# Altium PCB Transmitter_PCB.PcbDoc (part 1 of 3)
Units mil, origin at the board's own origin, x right, y up, seen from the top; angles counter-clockwise.
Board outline 1968.5 x 1968.5 mil, 2 copper layers (Top Layer, Bottom Layer), stack 57 mil thick; 93 components, 58 nets, 274 pads, 96 vias.
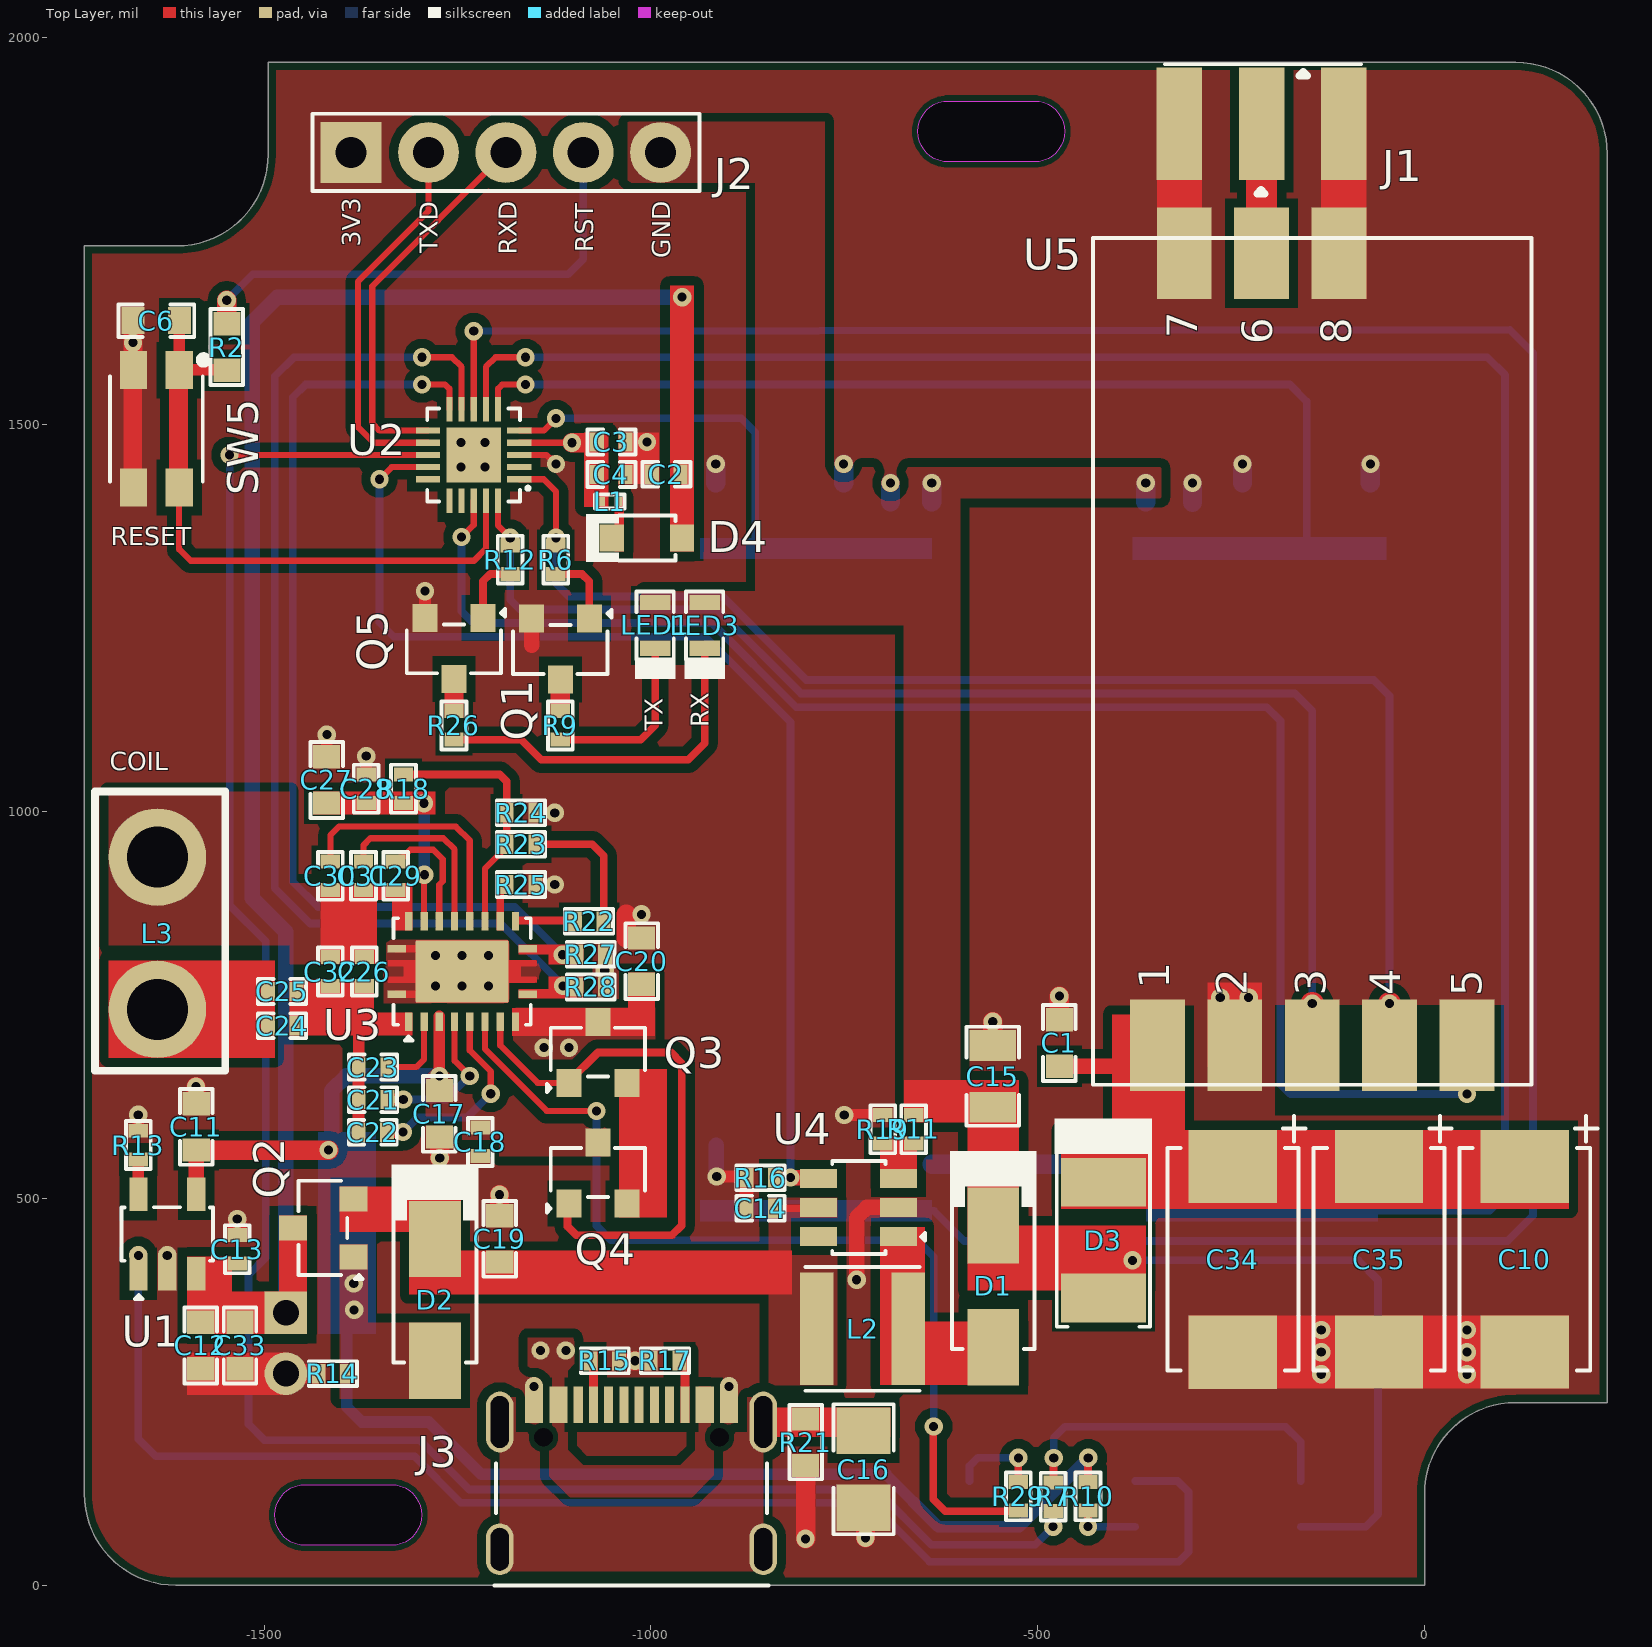
[diagram p0: Top Layer view]
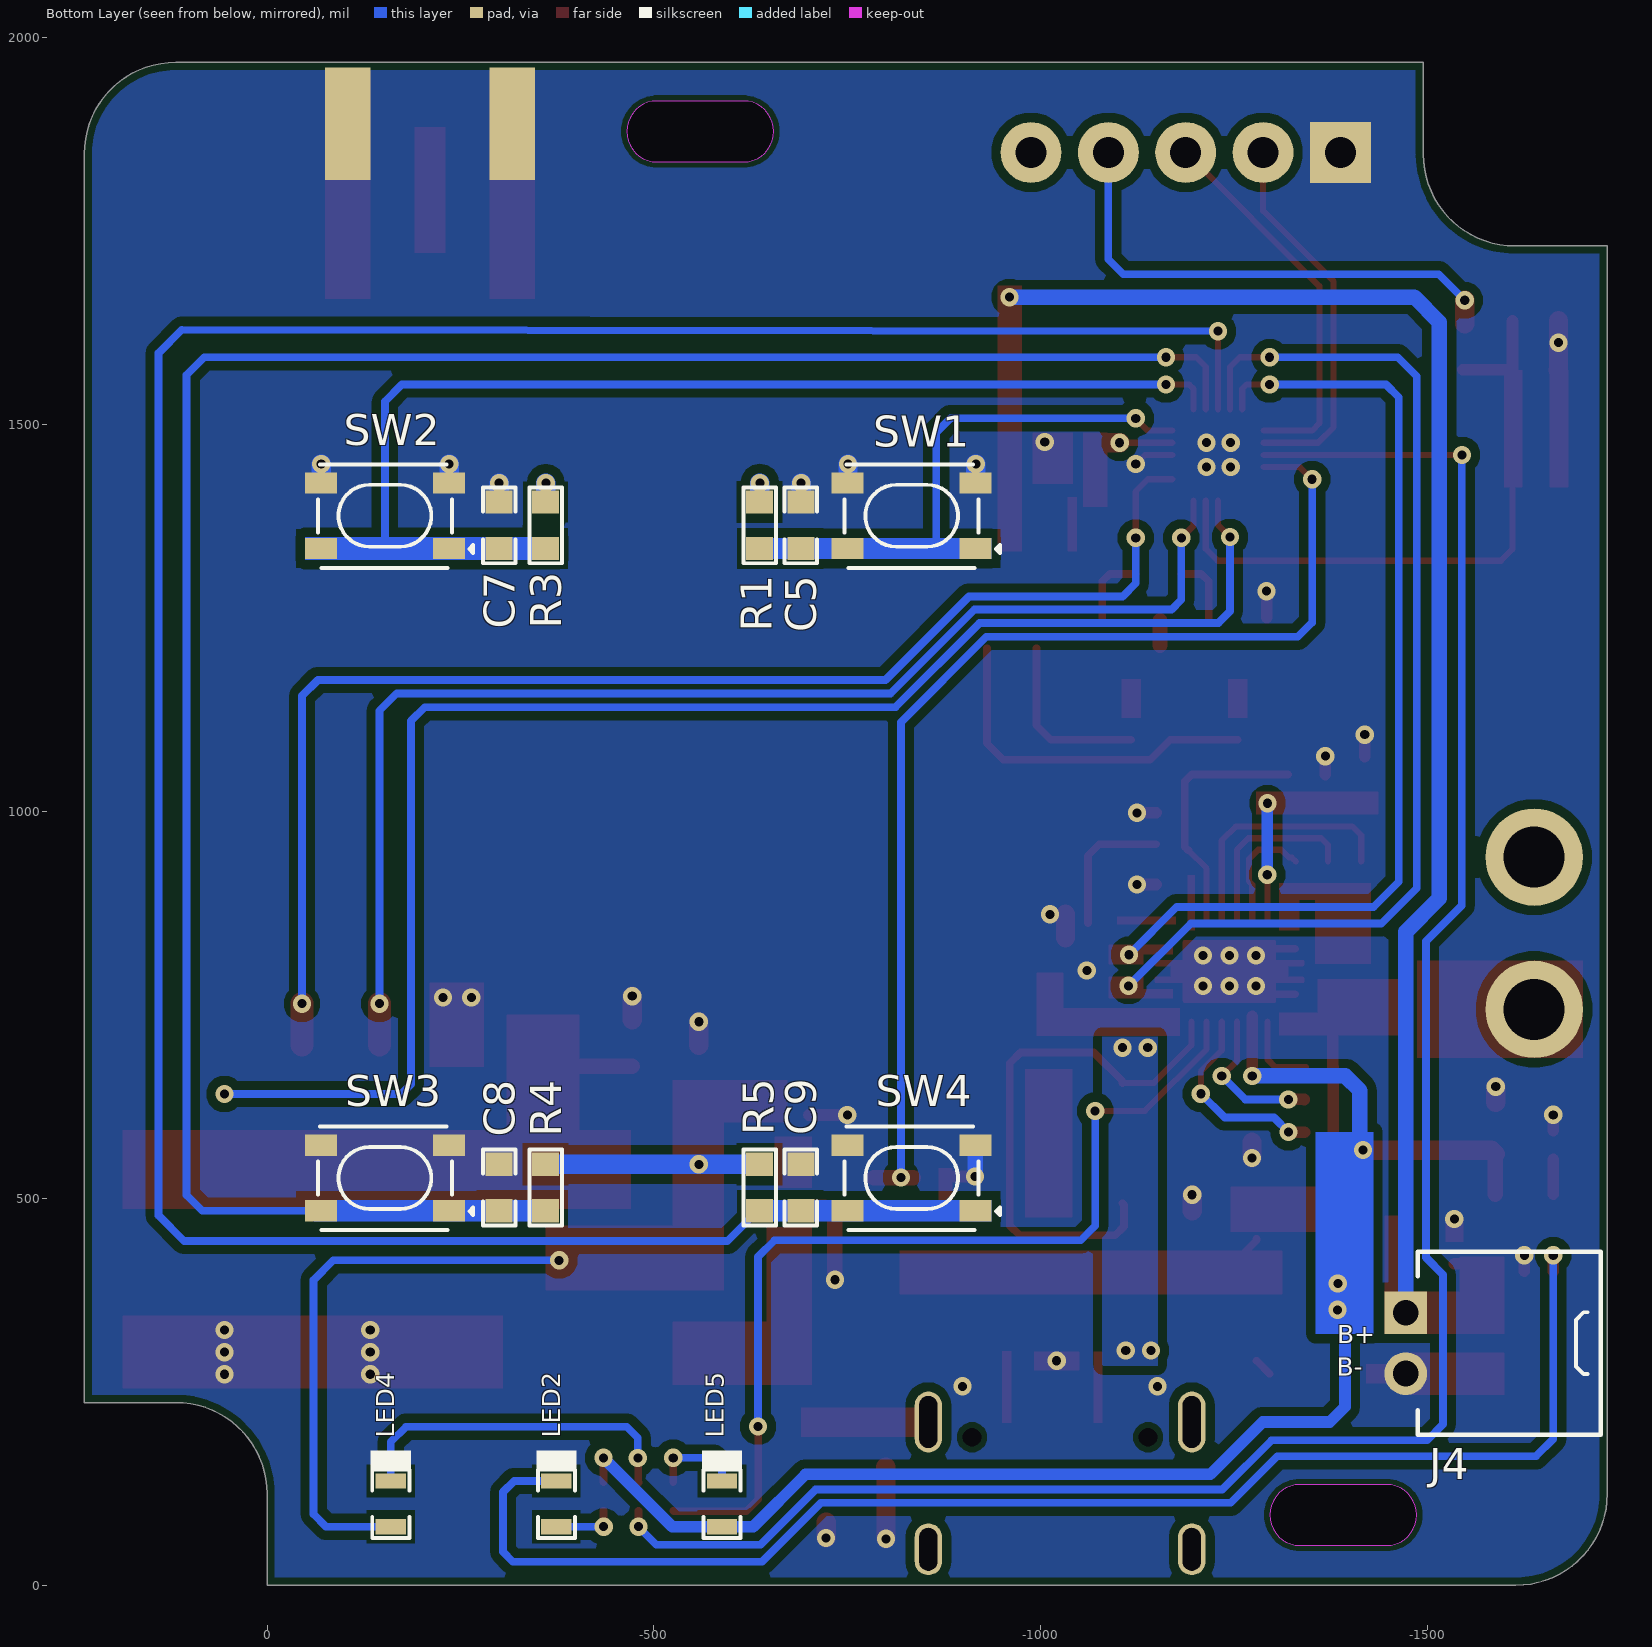
[diagram p1: Bottom Layer view, seen from below]
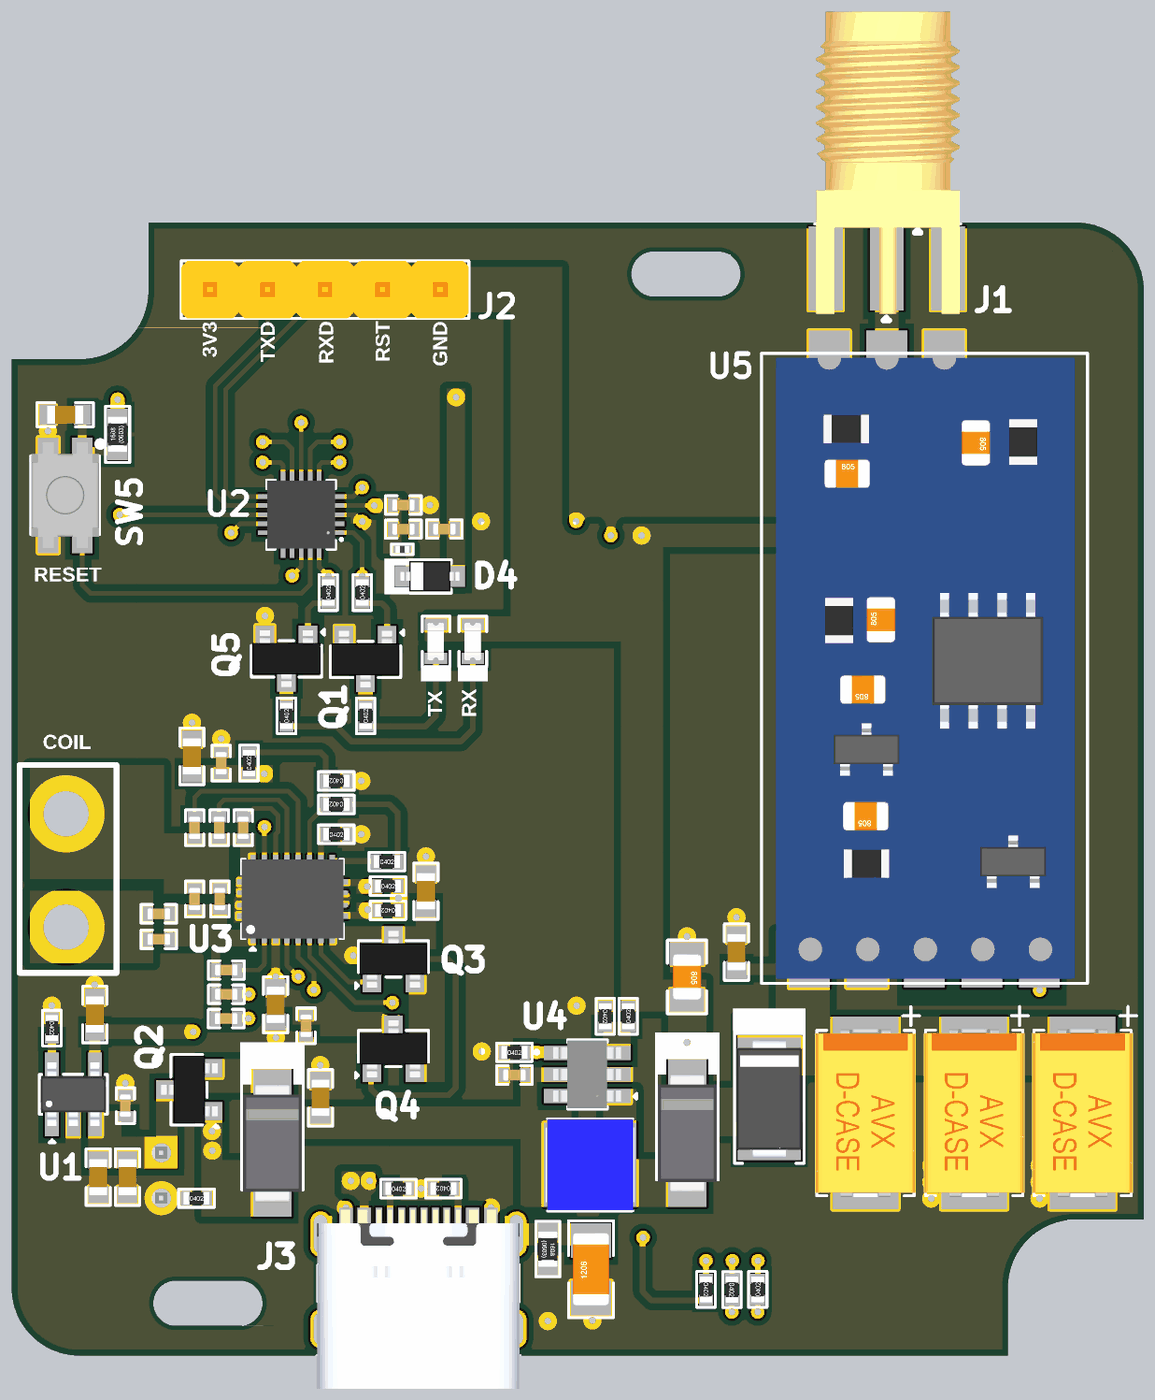
[diagram p3: 3D render of the assembled board from above, using the file's embedded part models]
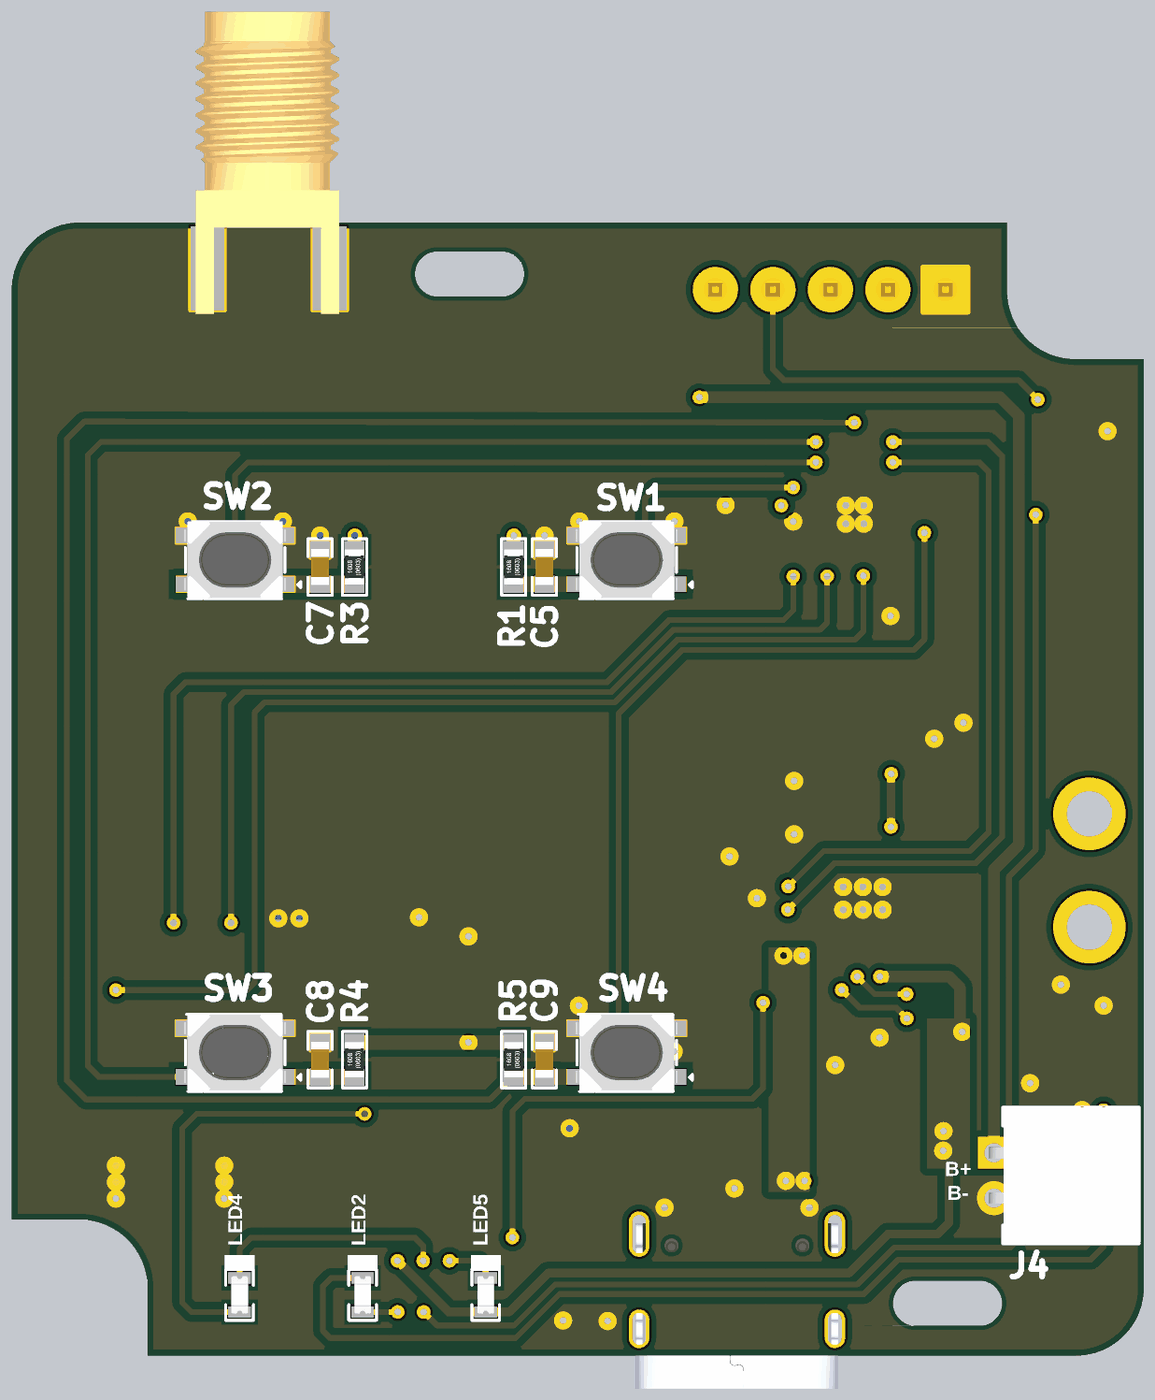
[diagram p4: 3D render of the assembled board from below, using the file's embedded part models]

## Layer stack, top to bottom
Top Solder: solder mask 3, Solder Resist, Dk 3.5
Top Layer: signal copper 10
Dielectric 1: dielectric 37, FR-4, Dk 4.8
Bottom Layer: signal copper 10
Bottom Solder: solder mask 3, Solder Resist, Dk 3.5

## Board outline
-1732.28,118.11 -1732.28,1731.28 -1614.5,1731.28 -1612.68,1731.28 ccw(c-1612.68,1849.39) -1494.57,1849.39 -1494.57,1968.5 118.11,1968.5 cw(c118.11,1850.39) 236.22,1850.39 236.22,236.22 119.94,236.22 118.11,236.22 ccw(c118.11,118.11) 0,118.11 0,0 -1614.17,0 cw(c-1614.17,118.11)
cut-out: -615.59,1839.77 cw(c-615.59,1879.14) -654.96,1879.14 cw(c-615.59,1879.14) -615.59,1918.51 -504.33,1918.51 cw(c-504.33,1879.14) -464.96,1879.14 cw(c-504.33,1879.14) -504.33,1839.77
cut-out: -1446.69,51.5 cw(c-1446.69,90.87) -1486.06,90.87 cw(c-1446.69,90.87) -1446.69,130.24 -1335.43,130.24 cw(c-1335.43,90.87) -1296.06,90.87 cw(c-1335.43,90.87) -1335.43,51.5

## Design rules (kind name [scope] priority, off if disabled: settings)
BoardOutlineClearance [All] p1: gap=0 ignorepadtopadclearanceinfootprint=FALSE except(10: Poly-OutlineEdge)
Clearance [All] p1: gap=7 ignorepadtopadclearanceinfootprint=FALSE except(5: SMDPad-Hole; 12: Arc-Poly Track-Poly SMDPad-Poly THPad-Poly Via-Poly Fill-Poly Poly-Poly)
ComponentClearance [All] p1: gap=0 collisioncheckmode=3 verticalgap=0 showdistances=FALSE
HoleSize [All] p1: absolutevalues=TRUE maxlimit=1000 minlimit=1 maxpercent=80.000 minpercent=20.000
HoleToHoleClearance [All] p1: gap=0 allowstackedmicrovias=TRUE
MinimumSolderMaskSliver [All] p1: minsoldermaskwidth=0
PolygonConnect [All] p1: connectstyle=Direct reliefconductorwidth=10 reliefentries=4 polygonreliefangle="90 Angle" airgapwidth=10
RoutingVias [All] p1: holewidth=11.81 width=23.62 viastyle="Through Hole" minholewidth=11.81 minwidth=19.68 maxholewidth=11.81 maxwidth=23.62
SilkToSilkClearance [All] p1: silktosilkclearance=0
SilkToSolderMaskClearance [IsPad] p1: minsilkscreentomaskgap=0 clearancetoexposedcopper=TRUE
SolderMaskExpansion [All] p1: expansion=4 istentingtop=FALSE
SupplyNets "Schematic Supply Nets_9" [InNet('EN1')] p1: voltage=0.000
SupplyNets "Schematic Supply Nets_8" [InNet('EN2')] p2: voltage=0.000
SupplyNets "Schematic Supply Nets_7" [InNet('GND')] p3: voltage=0.000
SupplyNets "Schematic Supply Nets_6" [InNet('VUSB')] p4: voltage=0.000
SupplyNets "Schematic Supply Nets_5" [InNet('VCC')] p5: voltage=0.000
SupplyNets "Schematic Supply Nets_4" [InNet('EN')] p6: voltage=0.000
SupplyNets "Schematic Supply Nets_3" [InNet('+5V')] p7: voltage=0.000
SupplyNets "Schematic Supply Nets_2" [InNet('VBAT')] p8: voltage=0.000
SupplyNets "Schematic Supply Nets_1" [InNet('POWER')] p9: voltage=0.000
SupplyNets "Schematic Supply Nets" [InNet('VCC#')] p10: voltage=0.000
Width [All] p1: maxlimit=50 minlimit=6 preferedwidth=10 minimp=50.000000 maximp=50.000000 favimp=50.000000
24 further rules are at their usual default settings.

## Classes and differential pairs
component class U_Power_Sheet: C11 C12 C13 C14 C15 C16 C17 C18 C19 C20 C21 C22 C23 C24 C25 C26 C27 C28 C29 C30 C31 C32 D1 D2 J3 L2 L3 LED2 Q2 Q3 Q4 R10 R11 R13 R14 R15 R16 R17 R18 R19 R21 R22 R23 R24 R25 R27 R28 U1 U3 U4
component class U_Transmitter_Section: C1 C2 C3 C4 C5 C6 C7 C8 C9 C10 C33 C34 C35 D3 D4 J1 J2 J4 L1 LED1 LED3 LED4 LED5 Q1 Q5 R1 R2 R3 R4 R5 R6 R7 R9 R12 R26 R29 SW1 SW2 SW3 SW4 SW5 U2 U5

## Components (designator, comment, footprint, x,y, rotation, side; value= is the part's Value field where it differs from the comment)
C1 "0.1uF" Cap0603 -472,701 r90 top
C2 "0.47uF" Cap-0402 -980,1436 r180 top
C3 "0.1uF" Cap-0402 -1051.08,1477.81 r180 top value=100nF
C4 "1uF" Cap-0402 -1051.08,1435.81 r180 top
C5 "0.1uF" Cap0603 -690,1370.1 r90 bottom
C6 "DNP" Cap0603 -1639.24,1634.63 r180 top
C7 "0.1uF" Cap0603 -300,1370.1 r90 bottom
C8 "0.1uF" Cap0603 -300,514.1 r90 bottom
C9 "0.1uF" Cap0603 -690,514.1 r90 bottom
C10 "330uF" CASE-D 129.64,421.46 r270 top
C11 "10uF" Cap-0603 -1587.6,592.5 r270 top
C12 "10uF" Cap-0603 -1581.79,310 r90 top
C13 "1nF" Cap-0402 -1534.58,434.32 r270 top
C14 "1nF" Cap-0402 -858.14,487.42 r0 top
C15 "22uF" Cap-0805 -558.08,657.9 r270 top
C16 "4.7nF" Cap-1206 -725,150 r90 top
C17 "10uF" Cap-0603 -1273.42,609.37 r90 top
C18 "100nF" Cap-0402 -1220.46,573.1 r90 top
C19 "10uF" Cap-0603 -1195.28,447.74 r270 top
C20 "10uF" Cap-0603 -1011.97,806.73 r90 top
C21 "0.47uF" Cap-0402 -1359.09,627.8 r0 top value=470nF
C22 "22nF" Cap-0402 -1359.38,585.6 r0 top
C23 "10nF" Cap-0402 -1359.09,669.84 r0 top
C24 "68nF" Cap-0402 -1476.57,723.22 r0 top
C25 "68nF" Cap-0402 -1476.56,767.54 r0 top
C26 "1nF" Cap-0402 -1370.29,793.33 r270 top
C27 "10uF" Cap-0603 -1418.99,1040.96 r270 top
C28 "100nF" Cap-0402 -1367.99,1029.5 r270 top
C29 "10nF" Cap-0402 -1329.68,917.04 r90 top
C30 "22nF" Cap-0402 -1414.27,917.04 r90 top
C31 "0.47uF" Cap-0402 -1371.42,917.04 r90 top value=470nF
C32 "1nF" Cap-0402 -1414.27,793.33 r270 top
C33 "0.47uF" Cap-0603 -1531,310 r90 top
C34 "330uF" CASE-D -247.72,421.34 r270 top
C35 "330uF" CASE-D -58.76,421.46 r270 top
D1 "SS32 /SMA(DO-214AC)" SMA -557.4,386.43 r270 top
D2 "SS16" SMA -1279,369 r270 top
D3 "1N4007- SMD" SMA(DO-214AC) -415,446 r270 top
D4 "CUS10S30,H3F" SOD-323 -1005.1,1353.68 r0 top
J1 "SMA Jack" CON-SMA-EDGE_S -316.85,1889 r270 top
J2 "DNP" HDR1X5 -1187.37,1852 r0 top
J3 "TYPE-C-31-M-12" TYPE-C-31-M-12_ -1025,140 r0 top
J4 "PH-2AW" PH-2AW -1471.79,312.88 r270 bottom
L1 "MMZ0603S601CT000" "IND 0201" -1053.08,1400.81 r180 top
L2 "4.7uH" SPH4012H4R7MT -726.4,331.43 r0 top
L3 "13.3uH" "Th Hole Test Point (3.7mm Drill 6mm pad)" -1637.79,941.22 r270 top
LED1 "Yellow" LED-0603 -994.44,1240.69 r270 top
LED2 "RED" LED-0603 -374,105.31 r90 bottom
LED3 "Yellow" LED-0603 -930.44,1240.69 r270 top
LED4 "RED" LED-0603 -160,105.31 r90 bottom
LED5 "Emerald" LED-0603 -588,105.31 r90 bottom
Q1 "L8050QLT1G" SOT-23 -1117,1210 r180 top
Q2 "WPM2015-3/TR" Sot-23 -1423.42,461.82 r90 top
Q3 "WPM2015-3/TR" Sot-23 -1068.37,688.7 r0 top
Q4 "WPM2015-3/TR" Sot-23 -1068.37,533 r0 top
Q5 "L8050QLT1G" SOT-23 -1254.49,1210.88 r180 top
R1 "4.7K" RES-0603 -636.64,1370.1 r270 bottom
R2 "4.7K" RES-0603 -1548.13,1600.49 r270 top
R3 "4.7K" RES-0603 -360,1370.1 r270 bottom
R4 "4.7K" RES-0603 -360,514.1 r270 bottom
R5 "4.7K" RES-0603 -636.64,514.1 r270 bottom
R6 "1K" Res-0402 -1122.74,1325.65 r90 top
R7 "120R" Res-0402 -480,114.5 r270 top
R9 "120R" Res-0402 -1117,1111.5 r90 top
R10 "680R" Res-0402 -435,115 r90 top
R11 "11K" Res-0402 -660.35,589.4 r90 top value=11kR
R12 "1K" Res-0402 -1181.9,1325.65 r90 top
R13 "2.7K" Res-0402 -1662.4,569 r270 top value=2.7kR
R14 "100K" Res-0402 -1411,273.51 r0 top
R15 "5.1K" Res-0402 -1059.53,289.99 r0 top
R16 "10K" Res-0402 -858.14,526.83 r0 top
R17 "5.1K" Res-0402 -981.69,290 r180 top
R18 "20K" Res-0402 -1319.68,1029.5 r90 top
R19 "1.5K" Res-0402 -700.11,589.4 r270 top
R21 "1M" Res-0603 -800,185 r90 top
R22 "470R" Res-0402 -1079.79,858.29 r0 top
R23 "80.6R" Res-0402 -1167.79,957.66 r180 top
R24 "200R" Res-0402 -1167.79,998.37 r180 top
R25 "10K" Res-0402 -1167.79,905.73 r0 top
R26 "120R" Res-0402 -1254.49,1111.5 r90 top
R27 "100K" Res-0402 -1077.79,815.62 r0 top
R28 "100K" Res-0402 -1077.79,773.37 r180 top
R29 "120R" Res-0402 -525,115 r270 top
SW1 "TSA016A2518A" TSA016A2518A -833.16,1382.42 r0 bottom
SW2 "TSA016A2518A" TSA016A2518A -152.29,1382.42 r0 bottom
SW3 "TSA016A2518A" TSA016A2518A -152.29,526.42 r0 bottom
SW4 "TSA016A2518A" TSA016A2518A -833.17,526.42 r0 bottom
SW5 "TS-1185EC-C-D-B" TS-1185EC-C-D-B -1639.24,1494.79 r270 top
U1 "TP4054" SOT-23-5 -1625,454 r90 top
U2 "ATTINY1616-MNR" 20-QFN -1228.95,1461.04 r180 top
U3 "BQ51013BRHLR" "20-VQFN (3.5x4.5)" -1243.89,793.33 r90 top
U4 "MT3608" SOT-23-6 -731.6,488.42 r180 top
U5 "HC-12 SMD" "HC-12 Module SMD" -108.73,1205 r90 top

## Footprints (in the part's own frame and the unit in brackets; to place one, negate y for a bottom-side part, rotate by r counter-clockwise, add the part's x,y. Pads: shape width x height; smd on the part's side, far side on the other; paste and mask are expansions set on the pad)
20-QFN [mm] "IC MCU 8BIT 16KB FLASH 20VQFN"
  rect 0.8x0.2 smd: 1(-1.5,0.8) 2(-1.5,0.4) 3(-1.5,0) 4(-1.5,-0.4) 5(-1.5,-0.8) 11(1.5,-0.8) 12(1.5,-0.4) 13(1.5,0) 14(1.5,0.4) 15(1.5,0.8)
  rect 0.2x0.8 smd: 6(-0.8,-1.5) 7(-0.4,-1.5) 8(0,-1.5) 9(0.4,-1.5) 10(0.8,-1.5) 16(0.8,1.5) 17(0.4,1.5) 18(0,1.5) 19(-0.4,1.5) 20(-0.8,1.5)
  rect 1.8x1.8 smd: 21(0,0)
  silkscreen extent -1.83,-1.52 1.52,1.52, body extent -1.5,-1.5 1.5,1.5, height 0.59
"20-VQFN (3.5x4.5)" [mm]
  rect 0.24x0.6 smd: 1(-0.75,2.15) 10(-0.75,-2.15) 11(0.75,-2.15) 20(0.75,2.15)
  rect 0.6x0.24 smd: 2(-1.65,1.75) 3(-1.65,1.25) 4(-1.65,0.75) 5(-1.65,0.25) 6(-1.65,-0.25) 7(-1.65,-0.75) 8(-1.65,-1.25) 9(-1.65,-1.75) 12(1.65,-1.75) 13(1.65,-1.25) 14(1.65,-0.75) 15(1.65,-0.25) 16(1.65,0.25) 17(1.65,0.75) 18(1.65,1.25) 19(1.65,1.75)
  rrect5% 2.05x3.05 smd paste-3: 21(0,0)
  Top Layer region: 381 vertices and 0 holes, not listed, extent -1.025,-2.45 1.025,2.45
  silkscreen extent -2.26,-2.25 1.75,2.25, body extent -1.75,-2.25 1.75,2.25, height 1
Cap0603 [mil]
  rect 30x35 smd mask+2.36: 1(-30,0) 2(30,0)
  silkscreen extent -49,-21 49,21, body extent -32,-16 31,16, height 34
Cap-0402 [mil]
  rect 18x25 smd mask+2.36: 1(-18.5,0) 2(18.5,0)
  silkscreen extent -31,-16 31,16, body extent -20,-10 20,10, height 19
Cap-0603 [mil]
  rect 30x35 smd mask+2.36: 1(-30,0) 2(30,0)
  silkscreen extent -49,-21 49,21, body extent -32,-16 31,16, height 34
Cap-0805 [mil] "SMD 0805"
  rect 40x60 smd mask+2.76: 1(-40,0) 2(40,0)
  silkscreen extent -64,-34 64,34, body extent -39,-25 39,25, height 30
Cap-1206 [mil] "SMD 1206"
  rect 60x70 smd: 1(-50,0) 2(50,0)
  silkscreen extent -84,-39 84,39, body extent -63,-31 63,32, height 39
CASE-D [mm]
  rect 2.4x2.9 smd: 1(-3.05,0) 2(3.05,0)
  silkscreen extent -4.7,-2.15 3.65,2.39, body extent -3.7,-2.22 3.7,2.22, height 3.01
CON-SMA-EDGE_S [mm]
  rect 3.7x1.5 smd: 1(0,2.7) 2(0,0) 3(0,5.4)
  rect 3.7x1.5 smd far side: 4(0,5.4) 5(0,0)
  silkscreen extent -1.96,-0.48 2.3,5.97, body extent -11.32,-0.42 2.01,5.93, height 3.55
"HC-12 Module SMD" [mm]
  rect 3x1.8 smd: 1(-12.873,6.006) 2(-12.873,3.466) 3(-12.873,0.926) 4(-12.873,-1.614) 5(-12.873,-4.154) 6(13.127,2.586) 7(13.127,5.126) 8(13.127,0.046)
  silkscreen extent -14.17,-6.27 13.63,8.13, body extent -13.98,-5.72 13.42,7.48, height 2.15
HDR1X5 [mm] "Through Hole,P=2.54mm"
  rect 2x2 hole 1.02: 1(-5.08,0)
  round 2 hole 1.02: 2(-2.54,0) 3(0,0) 4(2.54,0) 5(5.08,0)
  silkscreen extent -6.35,-1.27 6.35,1.27, body extent -6.35,-1.27 6.35,1.27, height 8.64
"IND 0201" [mm]
  rect 0.25x0.3 smd mask+0.055: 1(-0.275,0) 2(0.275,0)
  silkscreen extent -0.48,-0.23 0.48,0.23, body extent -0.3,-0.15 0.3,0.15, height 0.15
LED-0603 [mm]
  rect 0.5x1 smd: 1(-0.75,0) 2(0.75,0)
  silkscreen extent -1.12,-0.66 1.75,0.66, body extent -0.82,-0.37 0.82,0.36, height 0.68
PH-2AW [mm]
  rect 1.4x1.4 hole 0.85 paste-2539.97 mask+0.05: 1(-1,0)
  round 1.4 hole 0.85 paste-2539.97 mask+0.05: 2(1,0)
  silkscreen extent -3,0.4 3,6.4, body extent -3,-0.23 3,6.43, height 4.9
Res-0402 [mil]
  rect 18x25 smd mask+2.17: 1(-18.5,0) 2(18.5,0)
  silkscreen extent -32,-17 32,16, body extent -23,-11 23,11, height 16
RES-0603 [mil]
  rect 30x35 smd: 1(-30,0) 2(30,0)
  silkscreen extent -49,-21 49,21, body extent -31,-17 31,17, height 18
Res-0603 [mil]
  rect 30x35 smd: 1(-30,0) 2(30,0)
  silkscreen extent -48,-21 48,21, body extent -31,-17 31,17, height 18
SMA [mm]
  rect 2.5x1.7 smd: 1(-2,0) 2(2,0)
  silkscreen extent -4.44,-1.42 2.06,1.42, body extent -2.6,-1.3 2.6,1.3, height 2.4
SMA(DO-214AC) [mm]
  rect 1.6x2.8 smd: 1(-1.9,0) 2(1.9,0)
  silkscreen extent -3.99,-1.6 2.84,1.6, body extent -2.6,-1.45 2.6,1.45, height 2.3
SOD-323 [mm]
  rect 0.8x0.9 smd mask+0.055: 1(-1.15,0) 2(1.15,0)
  silkscreen extent -2.01,-0.79 0.94,0.79, body extent -1.3,-0.67 1.3,0.67, height 1.1
SOT-23 [mm] "TRANS NPN 40V 0.6A SOT23"
  rect 0.82x0.92 smd: 1(-0.95,-1) 2(0.95,-1) 3(0,1)
  silkscreen extent -1.68,-1.3 1.55,0.81, body extent -1.5,-1.25 1.5,1.25, height 1.05
Sot-23 [mm] "TRANS NPN 40V 0.6A SOT23"
  rect 0.82x0.92 smd: 1(-0.95,-1) 2(0.95,-1) 3(0,1)
  silkscreen extent -1.68,-1.3 1.55,0.81, body extent -1.5,-1.25 1.5,1.25, height 1.05
SOT-23-5 [mm]
  rect 1.1x0.6 smd: 1(-1.3,0.95) 2(-1.3,0) 3(-1.3,-0.95) 4(1.3,-0.95) 5(1.3,0.95)
  silkscreen extent -2.13,-1.5 0.88,1.5, body extent -1.4,-1.45 1.4,1.45, height 1.45
SOT-23-6 [mm]
  rect 1.22x0.62 smd: 1(-1.31,0.95) 2(-1.31,0) 3(-1.31,-0.95) 4(1.31,-0.95) 5(1.31,0) 6(1.31,0.95)
  silkscreen extent -2.18,-1.52 0.86,1.52, body extent -1.5,-1.5 1.5,1.5, height 1.47
SPH4012H4R7MT [mm]
  rect 1.1x3.7 smd: 1(-1.5,0) 2(1.5,0)
  silkscreen extent -1.88,-2.03 1.88,2.03, body extent -2,-2 2,2, height 2
"Th Hole Test Point (3.7mm Drill 6mm pad)" [mm]
  round 3.2 hole 2: 1(0,0) 2(5,0)
TS-1185EC-C-D-B [mm]
  rect 1.25x0.9 smd: 1(-1.925,0.75) 1(1.925,0.75) 2(-1.925,-0.75) 2(1.925,-0.75)
  silkscreen extent -2.39,-1.52 1.73,1.68, body extent -2.33,-1.5 2.32,1.5, height 2
TSA016A2518A [mm]
  rect 1.05x0.7 smd paste+0 mask+0.051: 1(-2.1,1.075) 2(2.1,1.075) 3(-2.1,-1.075) 4(2.1,-1.075)
  silkscreen extent -2.9,-1.69 2.2,1.71, body extent -2.25,-1.7 2.25,1.7, height 2.5
TYPE-C-31-M-12_ [mm]
  rect 0.6x1.2 smd: A1/B12(-3.2,2.375) A4/B9(-2.4,2.375) B1/A12(3.2,2.375) B4/A9(2.4,2.375)
  rect 0.3x1.2 smd: A5(-1.25,2.375) A6(-0.25,2.375) A7(0.25,2.375) A8(1.25,2.375) B5(1.75,2.375) B6(0.75,2.375) B7(-0.75,2.375) B8(-1.75,2.375)
  round 0 hole 0.62 unplated: MH(-2.89,1.305) MH(2.89,1.305)
  oval 0.9x2 hole 0.6 slot 1.7 at 90 deg: S1(4.325,1.805) S4(-4.325,1.805)
  oval 0.9x1.7 hole 0.6 slot 1.4 at 90 deg: S2(4.325,-2.375) S3(-4.325,-2.375)
  silkscreen extent -4.5,-3.57 4.5,0.44, body extent -4.47,-5.01 4.47,2.89, height 3.31

## Part data
C1 C5 C6 C7 C8 C9: library part CC0603ZRY5V9BB104, "CAP CER 0.1UF 50V Y5V 0603", Capacitance=100nF, Case Code (Imperial)=0603, Case Code (Metric)=1608, Dielectric=Y5V, Manufacturer=Yageo, Max Operating Temperature=85°C, Min Operating Temperature=-30°C, Package Quantity=1, Supplier Part Number 1=311-1343-1-ND, Tolerance=80%, Voltage=50V, Case/Package=0603, ComponentLink1Description=http://www.yageo.com/documents/recent/UPY-GPHC_Y5V_6.3V-to-50V_8.pdf?src-supplier=Digi-Key, ComponentLink1URL=http://www.yageo.com/documents/recent/UPY-GPHC_Y5V_6.3V-to-50V_8.pdf?src-supplier=Digi-Key, ComponentLink2Description=http://www.yageo.com/documents/recent/UPY-GPHC_Y5V_6.3V-to-50V_5.pdf?src-supplier=Avnet+Europe, ComponentLink2URL=http://www.yageo.com/documents/recent/UPY-GPHC_Y5V_6.3V-to-50V_5.pdf?src-supplier=Avnet+Europe, ComponentLink3Description=https://www.verical.com/server-webapp/html/getDatasheet?partID=403611&src-supplier=Verical, ComponentLink3URL=https://www.verical.com/server-webapp/html/getDatasheet?partID=403611&src-supplier=Verical, ComponentLink4Description=http://www.mouser.com/ds/2/447/Yageo_UPY-GP_NP0_16V-to-50V_9-358835.pdf?src-supplier=Mouser, ComponentLink4URL=http://www.mouser.com/ds/2/447/Yageo_UPY-GP_NP0_16V-to-50V_9-358835.pdf?src-supplier=Mouser, ComponentLink5Description=http://www.farnell.com/datasheets/1132289.pdf?src-supplier=Element14, ComponentLink5URL=http://www.farnell.com/datasheets/1132289.pdf?src-supplier=Element14, Composition=Ceramic, Depth=0.8mm, Halogen Free="Halogen Free", Height=0.8mm, Lead Free="Lead Free", Length=1.6mm, Manufacturer Part Number=CC0603ZRY5V9BB104, Mount="Surface Mount", Number of Pins=2, Packaging="Tape and Reel", Pricing 1="1=0.1, 10=0.075, 100=0.0334, 500=0.02386, 1000=0.01874 (USD)", Radiation Hardening=No, REACH SVHC="No SVHC", Stock 1=15000880, Supplier 1=Digi-Key, Termination=SMD/SMT, Thickness=0.035inch, Voltage Rating=50V, Voltage Rating (DC)=50V, Width=0.031inch
C2: library part CC0402KRX5R7BB474, "CAP CER 0.47UF 16V X5R 0402", Capacitance=470nF, Case/Package=0402, LCSC Part Number=C527010, Manufacturer=Yageo, Max Operating Temperature=85°C, Min Operating Temperature=-55°C, Supplier Part Number 1=1070400, Tolerance=10%, Voltage Rating=16V, Category="Ceramic Capacitors", ComponentLink1Description=http://www.yageo.com/documents/recent/UPY-GPHC_X5R_4V-to-50V_25.pdf?src-supplier=Digi-Key, ComponentLink1URL=http://www.yageo.com/documents/recent/UPY-GPHC_X5R_4V-to-50V_25.pdf?src-supplier=Digi-Key, ComponentLink2Description=http://www.yageo.com/exep/pages/download/literatures/ProductSelectionGuide%202014_Final_2.pdf?src-supplier=Digi-Key, ComponentLink2URL=http://www.yageo.com/exep/pages/download/literatures/ProductSelectionGuide%202014_Final_2.pdf?src-supplier=Digi-Key, Halogen Free="Halogen Free", Item Type=Capacitor, Lead Free="Lead Free", Length=0.039inch, Manufacturer Part Number=CC0402KRX5R7BB474, Mount="Surface Mount", Packaging="Tape and Reel", Pricing 1="10000=0.01840, 20000=0.01800, 40000=0.01760, 50000=0.01750, 150000=0.01670 (USD)", RoHS=Yes, RoHS Compliant=Yes, Stock 1=10000, Supplier 1="Future Electronics", Thickness=0.022inch, Voltage Rating (DC)=16V, Width=0.02inch
C3: library part CC0402JRX7R7BB104, "CAP CER 0.1UF 16V X7R 0402", Case Code (Imperial)=0402, Case Code (Metric)=1005, Dielectric=X7R, LCSC Part Number=C541464, Manufacturer=Yageo, Max Operating Temperature=125°C, Min Operating Temperature=-55°C, Package Quantity=10000, Supplier Part Number=311-1676-1-ND, Tolerance=5%, Voltage Rating=16V, Case/Package=0402, Category="Ceramic Capacitors", ComponentLink1Description=https://datasheet.ciiva.com/13210/upy-gphc-x7r-6-3v-to-50v-8-12304-13210152.pdf?src-supplier=Mouser, ComponentLink1URL=https://datasheet.ciiva.com/13210/upy-gphc-x7r-6-3v-to-50v-8-12304-13210152.pdf?src-supplier=Mouser, Construction=Flat, Halogen Free="Halogen Free", Height=0.5mm, Item Type=Capacitor, Lead Free="Lead Free", Length=0.039inch, Manufacturer Part Number=CC0402JRX7R7BB104, Material=4241ConductorMaterial, Mounting Technology="Surface Mount", Packaging="Tape and Reel", Pricing="1=0.1, 10=0.046, 50=0.0262, 100=0.0203, 500=0.01528, 1000=0.012, 2500=0.01091, 5000=0.01004 (USD)", RoHS=Yes, RoHS Compliant=Yes, Series=CC, Stock=1659111, Supplier=Digikey, Thickness=0.022inch, Voltage Rating (DC)=16V, Width=0.02inch
C4: library part CC0402KRX5R7BB105, "CAP CER 1UF 16V X5R 0402", Case Code (Imperial)=0402, Case Code (Metric)=1005, Dielectric=X5R, LCSC Part Number=C325464, Manufacturer=Yageo, Max Operating Temperature=85°C, Min Operating Temperature=-55°C, Supplier Part Number 1=311-1691-6-ND, Tolerance=10%, Voltage Rating=16V, Capacitance=1uF, Case/Package=0402, ComponentLink1Description=http://www.yageo.com/documents/recent/UPY-GPHC_X5R_4V-to-50V_12.pdf?src-supplier=Avnet+Europe, ComponentLink1URL=http://www.yageo.com/documents/recent/UPY-GPHC_X5R_4V-to-50V_12.pdf?src-supplier=Avnet+Europe, Composition=Ceramic, Depth=0.5mm, Halogen Free="Halogen Free", Height=0.5mm, Item Type=Capacitor, Lead Free="Lead Free", Length=1mm, Manufacturer Part Number=CC0402KRX5R7BB105, Mount="Surface Mount", Packaging="Tape and Reel", Pricing 1="1=0.36, 10=0.252, 100=0.1512, 500=0.1134, 1000=0.09576, 2500=0.09072, 5000=0.08568 (USD)", Radiation Hardening=No, Stock 1=1405667, Supplier 1=Digi-Key, Termination=SMD/SMT, Thickness=0.022inch, Voltage Rating (DC)=16V, Weight=2.3E-05oz, Width=0.02inch
C10 C34 C35: library part TAJD337K010RNJ, "CAP TANT 330UF 10% 10V 2917", Dielectric Material=5684ConductorMaterial, LCSC Part Number=C7226, Manufacturer="Kyocera AVX", Ripple Current=408mA, Voltage Rating (AC)=10V, ComponentLink1Description=https://datasheet.ciiva.com/11794/0900766b802e69d0-11794408.pdf?src-supplier=Rs, ComponentLink1URL=https://datasheet.ciiva.com/11794/0900766b802e69d0-11794408.pdf?src-supplier=Rs, ComponentLink2Description=https://datasheet.ciiva.com/19467/1236841-19467295.pdf?src-supplier=Jameco, ComponentLink2URL=https://datasheet.ciiva.com/19467/1236841-19467295.pdf?src-supplier=Jameco, ComponentLink3Description=https://datasheet.ciiva.com/26944/getdatasheetpartid-149137-26944845.pdf?src-supplier=Verical, ComponentLink3URL=https://datasheet.ciiva.com/26944/getdatasheetpartid-149137-26944845.pdf?src-supplier=Verical, ComponentLink4Description=https://datasheet.ciiva.com/3004/taj-3004541.pdf?src-supplier=Avnet, ComponentLink4URL=https://datasheet.ciiva.com/3004/taj-3004541.pdf?src-supplier=Avnet, ComponentLink5Description=https://datasheet.ciiva.com/3004/taj-3004542.pdf?src-supplier=Avnet, ComponentLink5URL=https://datasheet.ciiva.com/3004/taj-3004542.pdf?src-supplier=Avnet, ComponentLink6Description=https://datasheet.ciiva.com/265/taj-265298.pdf?src-supplier=Digikey, ComponentLink6URL=https://datasheet.ciiva.com/265/taj-265298.pdf?src-supplier=Digikey, ComponentLink7Description=https://datasheet.ciiva.com/265/taj-265299.pdf?src-supplier=Digikey, ComponentLink7URL=https://datasheet.ciiva.com/265/taj-265299.pdf?src-supplier=Digikey, ComponentLink8Description=https://datasheet.ciiva.com/265/taj-265300.pdf?src-supplier=Digikey, ComponentLink8URL=https://datasheet.ciiva.com/265/taj-265300.pdf?src-supplier=Digikey, ComponentLink9Description=https://datasheet.ciiva.com/7832/1680476-7832489.pdf?src-supplier=Element14, ComponentLink9URL=https://datasheet.ciiva.com/7832/1680476-7832489.pdf?src-supplier=Element14, ComponentLink10Description=https://datasheet.ciiva.com/7832/1680476-7832490.pdf?src-supplier=Element14, ComponentLink10URL=https://datasheet.ciiva.com/7832/1680476-7832490.pdf?src-supplier=Element14, ComponentLink11Description=https://datasheet.ciiva.com/7832/1680476-7832491.pdf?src-supplier=Element14, ComponentLink11URL=https://datasheet.ciiva.com/7832/1680476-7832491.pdf?src-supplier=Element14, Item Type=Capacitor, Lead Free=5697LeadFree, Life (Hours)=1000Hour, Manufacturer Part Number=TAJD337K010RNJ, Pricing="500=0.37263 (USD)", RoHS=Yes, Stock=24500, Supplier=Avnet
C11 C12 C17 C19 C20 C27: library part CL10A106MA8NRNC, "CAP CER 10UF 25V X5R 0603", Case Code (Imperial)=0603, Case Code (Metric)=1608, Dielectric=X5R, LCSC Part Number=C96446, Manufacturer=Samsung, Max Operating Temperature=85°C, Min Operating Temperature=-55°C, Package Quantity=1, Tolerance=20%, Voltage Rating=25V, Capacitance=10uF, Case/Package=0603, Category="Ceramic Capacitors", ComponentLink1Description=https://datasheet.ciiva.com/25766/cl10a106ma8nrnc-25766562.pdf?src-supplier=Digi-Key, ComponentLink1URL=https://datasheet.ciiva.com/25766/cl10a106ma8nrnc-25766562.pdf?src-supplier=Digi-Key, Construction=Flat, Contact Plating=Tin, Lead Free="Lead Free", Length=0.063inch, Manufacturer Part Number=CL10A106MA8NRNC, Mount="Surface Mount", Packaging="Tape and Reel", Pricing 1="4000=0.03753, 8000=0.03700, 16000=0.03595, 24000=0.03515, 32000=0.03383, 40000=0.03304, 400000=0.03225 (USD)", RoHS=Yes, RoHS Compliant=Yes, Series=CL, Supplier 1=Avnet, Supplier Part Number 1=CL10A106MA8NRNC, Termination=Wraparound, Thickness=0.035inch, Width=0.031inch
C13 C14: library part CC0402KRX7R8BB102, "CAP CER 1000PF 25V X7R 0402", Case Code (Imperial)=0402, Case Code (Metric)=1005, Dielectric=X7R, Insulation Resistance=10GR, LCSC Part Number=C541372, Manufacturer=Yageo, Max Operating Temperature=125°C, Min Operating Temperature=-55°C, Tolerance=10%, Voltage Rating=25V, Capacitance=1nF, Case/Package=0402, Category="Ceramic Capacitors", ComponentLink1Description=https://datasheet.ciiva.com/26862/getdatasheetpartid-639817-26862638.pdf?src-supplier=Verical, ComponentLink1URL=https://datasheet.ciiva.com/26862/getdatasheetpartid-639817-26862638.pdf?src-supplier=Verical, ComponentLink2Description=https://datasheet.ciiva.com/5425/upy-gp-np0-16v-to-50v-8-3714-5425527.pdf?src-supplier=Mouser, ComponentLink2URL=https://datasheet.ciiva.com/5425/upy-gp-np0-16v-to-50v-8-3714-5425527.pdf?src-supplier=Mouser, Depth=0.5mm, Dissipation Factor=2.5%, Halogen Free="Halogen Free", Item Type=Capacitor, Lead Free="Lead Free", Length=1mm, Manufacturer Part Number=CC0402KRX7R8BB102, Mount="Surface Mount", Number of Pins=2, Packaging="Tape and Reel", Pricing 1="1=0.00230, 10000=0.00230, 100001=0.00190 (USD)", Radiation Hardening=No, RoHS=Yes, RoHS Compliant=Yes, Series=CC, Stock 1=370000, Supplier 1="Arrow Electronics", Supplier Part Number 1=CC0402KRX7R8BB102, Termination=SMD/SMT, Thickness=0.022inch, Voltage Rating (DC)=25V, Width=0.02inch
C15: library part CC0805MKX5R8BB226, "CAP CER 22UF 25V X5R 0805", Case Code (Imperial)=0805, Case Code (Metric)=2012, Dielectric=X5R, LCSC Part Number=C784585, Manufacturer=Yageo, Max Operating Temperature=85°C, Min Operating Temperature=-55°C, Package Quantity=3000, Supplier Part Number 1=311-1903-1-ND, Tolerance=20%, Voltage Rating=25V, Capacitance=22uF, Case/Package=0805, Category="Ceramic Capacitors", ComponentLink1Description=http://www.mouser.com/ds/2/447/Yageo_UPY-GP_NP0_16V-to-50V_9-358835.pdf?src-supplier=Mouser, ComponentLink1URL=http://www.mouser.com/ds/2/447/Yageo_UPY-GP_NP0_16V-to-50V_9-358835.pdf?src-supplier=Mouser, ComponentLink2Description=http://www.yageo.com/documents/recent/UPY-GPHC_X5R_4V-to-50V_25.pdf?src-supplier=Digi-Key, ComponentLink2URL=http://www.yageo.com/documents/recent/UPY-GPHC_X5R_4V-to-50V_25.pdf?src-supplier=Digi-Key, Halogen Free="Halogen Free", Height=1.25mm, Item Type=Capacitor, Lead Free="Lead Free", Length=0.079inch, Manufacturer Part Number=CC0805MKX5R8BB226, Mount="Surface Mount", Packaging="Tape and Reel", Pricing 1="1=0.47000, 10=0.33300, 50=0.25140, 100=0.21900, 500=0.16222, 1000=0.13789 (USD)", RoHS=Yes, RoHS Compliant=Yes, Stock 1=64970, Supplier 1=Digi-Key, Termination=SMD/SMT, Thickness=0.057inch, Voltage Rating (DC)=25V, Weight=0.000194oz, Width=0.049inch
C16: library part CC1206KKX7RCBB472, "CAP CER 4700PF 1KV X7R 1206", Case Code (Imperial)=1206, Case Code (Metric)=3216, Dielectric=X7R, Dielectric Material=Ceramic, LCSC Part Number=C107198, Manufacturer=Yageo, Max Operating Temperature=125°C, Min Operating Temperature=-55°C, Supplier Part Number 1=7130131, Tolerance=10%, Voltage Rating=1kV, Capacitance=4.7nF, Case/Package=1206, Category="Ceramic Capacitors", ComponentLink1Description=https://datasheet.ciiva.com/13208/upy-gp-np0-16v-to-50v-8-13208693.pdf?src-supplier=Mouser, ComponentLink1URL=https://datasheet.ciiva.com/13208/upy-gp-np0-16v-to-50v-8-13208693.pdf?src-supplier=Mouser, ComponentLink2Description=https://datasheet.ciiva.com/11466/hv-11466701.pdf?src-supplier=Avnet, ComponentLink2URL=https://datasheet.ciiva.com/11466/hv-11466701.pdf?src-supplier=Avnet, Depth=1.6mm, Item Type=Capacitor, Lead Free="Lead Free", Length=3.2mm, Manufacturer Part Number=CC1206KKX7RCBB472, Mount="Surface Mount", Number of Pins=2, Packaging="Tape and Reel", Pricing 1="3000=0.02860, 9000=0.02750, 15000=0.02700, 45000=0.02600, 75000=0.02510 (USD)", Radiation Hardening=No, Resistor Type=Ceramic, RoHS=Yes, RoHS Compliant=Yes, Series=CC, Stock 1=180000, Supplier 1="Future Electronics", Termination=SMD/SMT, Thickness=0.057inch, Voltage Rating (DC)=1kV, Weight=0.000571oz, Width=0.063inch
C18 C28: library part CC0402KRX5R8BB104, "CAP CER 0.1UF 25V X5R 0402", Case Code (Imperial)=0402, Case Code (Metric)=1005, Dielectric=X5R, LCSC Part Number=C106256, Manufacturer=Yageo, Max Operating Temperature=85°C, Min Operating Temperature=-55°C, Resistor Type=Ceramic, Supplier Part Number 1=311-1697-1-ND, Tolerance=10%, Voltage Rating=25V, Capacitance=100nF, Case/Package=0402, Category="Ceramic Capacitors", ComponentLink1Description=http://www.mouser.com/ds/2/447/UPY-GPHC_X5R_4V-to-50V_25-1131599.pdf?src-supplier=Mouser, ComponentLink1URL=http://www.mouser.com/ds/2/447/UPY-GPHC_X5R_4V-to-50V_25-1131599.pdf?src-supplier=Mouser, ComponentLink2Description=http://www.yageo.com/documents/recent/UPY-GPHC_X5R_4V-to-50V-16.pdf?src-supplier=Future+Electronics, ComponentLink2URL=http://www.yageo.com/documents/recent/UPY-GPHC_X5R_4V-to-50V-16.pdf?src-supplier=Future+Electronics, ComponentLink3Description=http://www.yageo.com/documents/recent/UPY-GPHC_X5R_4V-to-50V_25.pdf?src-supplier=Digi-Key, ComponentLink3URL=http://www.yageo.com/documents/recent/UPY-GPHC_X5R_4V-to-50V_25.pdf?src-supplier=Digi-Key, Depth=0.5mm, Halogen Free="Halogen Free", Item Type=Capacitor, Lead Free="Lead Free", Length=0.039inch, Manufacturer Part Number=CC0402KRX5R8BB104, Mount="Surface Mount", Packaging="Tape and Reel", Pricing 1="1=0.10000, 10=0.03800, 50=0.02100, 100=0.01710, 500=0.01224, 1000=0.00961, 2500=0.00874, 5000=0.00804 (USD)", RoHS=Yes, RoHS Compliant=Yes, Series=CC, Stock 1=4598218, Supplier 1=Digi-Key, Thickness=0.022inch, Voltage Rating (DC)=25V, Width=0.02inch
C21 C31: library part CL05A474KA5NNNC, "CAP CER 0.47UF 25V X5R 0402", Case Code (Imperial)=0402, Case Code (Metric)=1005, Manufacturer=Samsung, Max Operating Temperature=85°C, Min Operating Temperature=-55°C, Tolerance=10%, Voltage Rating=25V, Case/Package=0402, Category="Ceramic Capacitors", ComponentLink1Description=https://datasheet.ciiva.com/25796/cl05a474ka5nnnc-25796037.pdf?src-supplier=Digikey, ComponentLink1URL=https://datasheet.ciiva.com/25796/cl05a474ka5nnnc-25796037.pdf?src-supplier=Digikey, ComponentLink2Description=https://datasheet.ciiva.com/29198/458859-da-01-en-vs-kondensator-0402-29198303.pdf?src-supplier=Conrad, ComponentLink2URL=https://datasheet.ciiva.com/29198/458859-da-01-en-vs-kondensator-0402-29198303.pdf?src-supplier=Conrad, Height=550um, Lead Free="Lead Free", Manufacturer Part Number=CL05A474KA5NNNC, Material=Ceramic, Mounting Technology="Surface Mount", Packaging="Cut Tape", Pricing="100000=0.02563 (USD)", RoHS=Yes, RoHS Compliant=Yes, Series=CL, Stock=80000, Supplier=Avnet, Supplier Part Number=CL05A474KA5NNNC, Voltage Rating (DC)=25V
C22 C30: library part GRM155B31H223KA12D, "50V 22nF B ±10% 0402 Multilayer Ceramic Capacitors MLCC - SMD/SMT ROHS", LCSC Part Number=C521247, Manufacturer="Murata Electronics", Package=0402, ComponentLink1Description=LCSC, ComponentLink1URL=https://www.lcsc.com/product-detail/Multilayer-Ceramic-Capacitors-MLCC-SMD-SMT_Murata-Electronics-GRM155B31H223KA12D_C521247.html, Item Type=Capacitor, Manufacturer Part Number=GRM155B31H223KA12D
C23 C29: library part CC0402KRX7R9BB103, "CAP CER 10000PF 50V X7R 0402", Case Code (Imperial)=0402, Case Code (Metric)=1005, Dielectric=X7R, LCSC Part Number=C60133, Manufacturer=Yageo, Max Operating Temperature=125°C, Min Operating Temperature=-55°C, Package Quantity=1, Resistor Type=Ceramic, Tolerance=10%, Voltage=50V, Capacitance=10nF, Case/Package=0402, Category="Ceramic Capacitors", ComponentLink1Description=https://datasheet.ciiva.com/11788/0900766b8079c870-11788375.pdf?src-supplier=RSComponents, ComponentLink1URL=https://datasheet.ciiva.com/11788/0900766b8079c870-11788375.pdf?src-supplier=RSComponents, ComponentLink2Description=https://datasheet.ciiva.com/26862/getdatasheetpartid-138248-26862642.pdf?src-supplier=Verical, ComponentLink2URL=https://datasheet.ciiva.com/26862/getdatasheetpartid-138248-26862642.pdf?src-supplier=Verical, ComponentLink3Description=https://datasheet.ciiva.com/7978/1489800-7978093.pdf?src-supplier=Element14, ComponentLink3URL=https://datasheet.ciiva.com/7978/1489800-7978093.pdf?src-supplier=Element14, ComponentLink4Description=https://datasheet.ciiva.com/28450/1489800-28450377.pdf?src-supplier=Element14, ComponentLink4URL=https://datasheet.ciiva.com/28450/1489800-28450377.pdf?src-supplier=Element14, ComponentLink5Description=https://datasheet.ciiva.com/176/mlccorderingcode-176349.pdf?src-supplier=Digi-Key, ComponentLink5URL=https://datasheet.ciiva.com/176/mlccorderingcode-176349.pdf?src-supplier=Digi-Key, ComponentLink6Description=https://datasheet.ciiva.com/176/mlccorderingcode-176348.pdf?src-supplier=Digi-Key, ComponentLink6URL=https://datasheet.ciiva.com/176/mlccorderingcode-176348.pdf?src-supplier=Digi-Key, ComponentLink7Description=https://datasheet.ciiva.com/176/mlccorderingcode-176350.pdf?src-supplier=Digi-Key, ComponentLink7URL=https://datasheet.ciiva.com/176/mlccorderingcode-176350.pdf?src-supplier=Digi-Key, Depth=0.5mm, Halogen Free="Halogen Free", Height=0.5mm, Item Type=Capacitor, Lead Free="Lead Free", Length=1mm, Manufacturer Part Number=CC0402KRX7R9BB103, Mount="Surface Mount", Packaging="Tape and Reel", Pricing 1="10000=0.00178 (USD)", Radiation Hardening=No, Reach SVHC Compliant=Yes, RoHS=Yes, RoHS Compliant=Yes, Series=CC, Stock 1=995000, Supplier 1=Avnet, Supplier Part Number 1=CC0402KRX7R9BB103, Termination=SMD/SMT, Thickness=0.022inch, Voltage Rating=50V, Voltage Rating (DC)=50V, Width=0.02inch
C24 C25: library part CC0402KRX7R9BB683, "CAP CER 0.068UF 50V X7R 0402", Case/Package=343Case, Dielectric=1511DielectricType, Manufacturer=Yageo, Supplier Part Number 1=2106471, Voltage Rating (DC)=50V, Capacitance=68nF, Category="Ceramic Capacitors", Halogen Free=5694HalogenFree, Item Type=Capacitor, Lead Free=5697LeadFree, Manufacturer Part Number=CC0402KRX7R9BB683, Pricing 1="10000=0.0035, 40000=0.0033, 100000=0.0032, 250000=0.0031, 400000=0.0029 (USD)", RoHS=Yes, Stock 1=100000, Supplier 1="Future Electronics"
C26 C32: library part C1005C0G1E102JT000F, "CAP CER 1000PF 25V C0G 0402", LCSC Part Number=C343059, Manufacturer=TDK, Package=0402, ComponentLink1Description=LCSC, ComponentLink1URL=https://www.lcsc.com/product-detail/Multilayer-Ceramic-Capacitors-MLCC-SMD-SMT_TDK-C1005C0G1E102JT000F_C343059.html, Item Type=Capacitor, Manufacturer Part Number=C1005C0G1E102JT000F
C33: library part CC0603KRX5R9BB474, "CAP CER 0.47UF 50V X5R 0603", Capacitance=470nF, Case/Package=0603, Dielectric=X5R, LCSC Part Number=C513651, Manufacturer=Yageo, Max Operating Temperature=85°C, Min Operating Temperature=-55°C, Supplier Part Number 1=311-4047-1-ND, Tolerance=10%, Voltage Rating=50V, Category="Ceramic Capacitors", ComponentLink1Description="https://www.mouser.com/ds/2/447/ProductSelectionGuide 2014_Final_2-1131690.pdf?src-supplier=Mouser", ComponentLink1URL="https://www.mouser.com/ds/2/447/ProductSelectionGuide 2014_Final_2-1131690.pdf?src-supplier=Mouser", ComponentLink2Description=http://www.yageo.com/documents/recent/UPY-GPHC_X5R_4V-to-50V_25.pdf?src-supplier=Digi-Key, ComponentLink2URL=http://www.yageo.com/documents/recent/UPY-GPHC_X5R_4V-to-50V_25.pdf?src-supplier=Digi-Key, ComponentLink3Description=http://www.yageo.com/exep/pages/download/literatures/ProductSelectionGuide%202014_Final_2.pdf?src-supplier=Digi-Key, ComponentLink3URL=http://www.yageo.com/exep/pages/download/literatures/ProductSelectionGuide%202014_Final_2.pdf?src-supplier=Digi-Key, Halogen Free="Halogen Free", Item Type=Capacitor, Lead Free="Lead Free", Length=0.063inch, Manufacturer Part Number=CC0603KRX5R9BB474, Mount="Surface Mount", Packaging="Tape and Reel", Pricing 1="1=0.45000, 10=0.31400, 50=0.22000, 100=0.18860, 500=0.14144, 1000=0.11944 (USD)", RoHS=Yes, RoHS Compliant=Yes, Stock 1=15145, Supplier 1=Digi-Key, Thickness=0.035inch, Voltage Rating (DC)=50V, Width=0.031inch
D1: "20V 500mV@3A 3A SMA(DO-214AC) Schottky Barrier Diodes (SBD) ROHS", LCSC Part Number=C34897, Manufacturer=MDD, Manufacturer Part Number=SS32, Package=SMA(DO-214AC), ComponentLink1Description=LCSC, ComponentLink1URL=https://www.lcsc.com/product-detail/Schottky-Barrier-Diodes-SBD_MDD-Microdiode-Electronics-SS32_C34897.html, Item Type=Diode
D2: "60V 700mV@1A 1A SMA(DO-214AC) Schottky Barrier Diodes (SBD) ROHS", LCSC Part Number=C2481, Manufacturer=MDD, Package=SMA(DO-214AC), ComponentLink1Description=LCSC, ComponentLink1URL=https://www.lcsc.com/product-detail/Schottky-Barrier-Diodes-SBD_MDD-Microdiode-Electronics-SS16_C2481.html, Item Type="Schottky Diode", Manufacturer Part Number=SS16
D3: "1A Single 1kV 1.1V@1A SMA(DO-214AC) Diodes - General Purpose ROHS", LCSC Part Number=C727081, Manufacturer=TWGMC, Manufacturer Part Number=1N4007, Package=SMA(DO-214AC), ComponentLink1Description=LCSC, ComponentLink1URL=https://www.lcsc.com/product-detail/Diodes-General-Purpose_TWGMC-1N4007_C727081.html, Item Type=Diode
D4: "Diode Schottky 30V 1A Surface Mount USC", Average Rectified Current=1A, Case/Package=SOD, LCSC Part Number=C146335, Manufacturer=Toshiba, Max Operating Temperature=125°C, Max Reverse Current=500uA, Max Reverse Voltage (DC)=30V, Min Operating Temperature=-55°C, Peak Non-Repetitive Surge Current=5A, Category="Rectifier Diodes", ComponentLink1Description=https://toshiba.semicon-storage.com/info/docget.jsp?did=14077&prodName=CUS10S30&src-supplier=Digi-Key, ComponentLink1URL=https://toshiba.semicon-storage.com/info/docget.jsp?did=14077&prodName=CUS10S30&src-supplier=Digi-Key, ComponentLink2Description=http://toshiba.semicon-storage.com/info/docget.jsp?did=14077&prodName=CUS10S30&src-supplier=Avnet, ComponentLink2URL=http://toshiba.semicon-storage.com/info/docget.jsp?did=14077&prodName=CUS10S30&src-supplier=Avnet, ComponentLink3Description=http://toshiba.semicon-storage.com/info/lookup.jsp?pid=CUS10S30&amp;lang=en&src-supplier=Mouser, ComponentLink3URL=http://toshiba.semicon-storage.com/info/lookup.jsp?pid=CUS10S30&amp;lang=en&src-supplier=Mouser, Contact Plating=Tin,Silver, Element Configuration=Single, Manufacturer Part Number=CUS10S30,H3F, Mount="Surface Mount", Number of Pins=2, Packaging="Cut Tape", Pricing 1="3000=0.04896, 6000=0.04768, 12000=0.04544, 18000=0.04416, 24000=0.04320, 30000=0.04192, 300000=0.04096 (USD)", RoHS=Yes, RoHS Compliant=No, Stock 1=9000, Supplier 1=Avnet, Supplier Part Number 1=CUS10S30,H3F
J1: library part CON-SMA-EDGE-S, "Sma Female Connector, Pcb Edge Mount Rohs Compliant: Yes", Case/Package=SMA, Manufacturer="RF Solutions", Package=THT, Supplier Part Number 1=1258191, Category="RF / Coaxial Connectors", ComponentLink1Description=https://media.digikey.com/pdf/Data%20Sheets/RF%20Solutions%20PDFs/CON-SMA-EDGE.pdf?src-supplier=Digi-Key, ComponentLink1URL=https://media.digikey.com/pdf/Data%20Sheets/RF%20Solutions%20PDFs/CON-SMA-EDGE.pdf?src-supplier=Digi-Key, Connector Type=SMA, Fastening Type=Threaded, Item Type=Connector, Manufacturer Part Number=CON-SMA-EDGE-S, Mount=Edge,Board, Number of Ports=1, Pricing 1="1=1.16, 10=0.96 (GBP)", RoHS=Yes, Series=-, Stock 1=4145, Supplier 1=Rs, Termination=Solder
J2: library part PZ254V-11-05P, "Pin Header 5 1 right-angle", Manufacturer=XFCN, ComponentLink1Description=LCSC, ComponentLink1URL=https://lcsc.com/product-detail/Pin-Headers_XFCN-PZ254V-11-05P_C492404.html, Manufacturer Part Number=PZ254V-11-05P
J3: "5A 1 16P Female Type-C SMD USB Connectors ROHS", LCSC Part Number=C165948, Manufacturer="Korean Hroparts Elec", ComponentLink1Description=LCSC, ComponentLink1URL=https://www.lcsc.com/product-detail/USB-Connectors_Korean-Hroparts-Elec-TYPE-C-31-M-12_C165948.html, Item Type="USB Connector", Manufacturer Part Number=TYPE-C-31-M-12
J4: "1x2P 2P PH 1 Tin 2mm 2 -25℃~+85℃ Brass 2A Bend insert Push-Pull,P=2mm Wire To Board Connector ROHS", LCSC Part Number=C2908634, Manufacturer=HCTL, Package=Push-Pull,P=2mm, ComponentLink1Description=LCSC, ComponentLink1URL=https://www.lcsc.com/product-detail/Wire-To-Board-Connector_HCTL-PH-2AW_C2908634.html, Item Type="Wire To Board Connector", Manufacturer Part Number=PH-2AW
L1: "FERRITE BEAD 600 OHM 0201 1LN", Case Code (Imperial)=0201, Case Code (Metric)=0603, Current Rating=100mA, DC Resistance (DCR)=1.45R, Manufacturer=TDK, Package Quantity=15000, Supplier Part Number 1=445-2146-1-ND, Tolerance=25%, Case/Package=0201, Category=Inductors, ComponentLink1Description=https://datasheet.ciiva.com/46381/1795294-46381669.pdf?src-supplier=Element14, ComponentLink1URL=https://datasheet.ciiva.com/46381/1795294-46381669.pdf?src-supplier=Element14, ComponentLink2Description=https://datasheet.ciiva.com/46634/beads-commercial-signal-mmz-en-46634390.pdf?src-supplier=Digi-Key, ComponentLink2URL=https://datasheet.ciiva.com/46634/beads-commercial-signal-mmz-en-46634390.pdf?src-supplier=Digi-Key, ComponentLink3Description=https://datasheet.ciiva.com/48682/beads-commercial-signal-mmz-en-48682603.pdf?src-supplier=Avnet, ComponentLink3URL=https://datasheet.ciiva.com/48682/beads-commercial-signal-mmz-en-48682603.pdf?src-supplier=Avnet, ComponentLink4Description=https://datasheet.ciiva.com/46634/beads-commercial-signal-mmz-en-46634381.pdf?src-supplier=Digi-Key, ComponentLink4URL=https://datasheet.ciiva.com/46634/beads-commercial-signal-mmz-en-46634381.pdf?src-supplier=Digi-Key, Core Material=Ferrite, Height=0.013inch, Impedance=600R, Lead Free="Lead Free", Length=0.024inch, Manufacturer Part Number=MMZ0603S601CT000, Max DC Current=100mA, Mount="Surface Mount", Packaging="Cut Tape", Pricing 1="1=0.12000, 10=0.09900, 25=0.07680, 50=0.06380, 100=0.05500, 250=0.04400, 500=0.03960, 1000=0.03300, 5000=0.03080 (USD)", REACH SVHC="No SVHC", RoHS=Yes, RoHS Compliant=Yes, Stock 1=1540, Supplier 1=Digi-Key, Width=0.012inch
L2: library part SPH4012H4R7MT, "1.2A 4.7uH ±20% 108mΩ SMD Power Inductors ROHS", LCSC Part Number=C98396, Manufacturer=Sunlord, Supplier Part Number 1=3442-SPH4012H4R7MTTR-ND, ComponentLink1Description=LCSC, ComponentLink1URL=https://www.lcsc.com/product-detail/Power-Inductors_Sunlord-SPH4012H4R7MT_C98396.html, Item Type=Inductor, Manufacturer Part Number=SPH4012H4R7MT, Pricing 1="4500=0.21008 (USD)", RoHS=No, Supplier 1=Digi-Key
L3: library part WR483265-15F5-G, "1 Coil, 1 Layer 13.3µH Wireless Charging Coil Receiver 200mOhm", Digikey Part Number=445-16090-ND, Manufacturer="TDK Corporation", Package=-, ComponentLink1Description=Digikey, ComponentLink1URL=https://www.digikey.com/en/products/detail/tdk-corporation/WR483265-15F5-G/4702656?s=N4IgTCBcDaIOoCUAsAOAzGAbAVgLQEZsAxPAcRAF0BfIA, Item Type="Wireless Charging Coil", Manufacturer Part Number=WR483265-15F5-G
LED1 LED3: library part NCD0603Y2, "yellow 0603 Light Emitting Diodes (LED) ROHS", LCSC Part Number=C89811, Manufacturer="Foshan NationStar Optoelectronics", Package=0603, ComponentLink1Description=LCSC, ComponentLink1URL=https://www.lcsc.com/product-detail/Light-Emitting-Diodes-LED_Foshan-NationStar-Optoelectronics-NCD0603Y2_C89811.html, Item Type=LED, Manufacturer Part Number=NCD0603Y2
LED2 LED4: library part NCD0603R3, "RED LED 0603 Light Emitting Diodes", LCSC Part Number=C3151730, Manufacturer="Foshan NationStar Optoelectronics", Package=0603, ComponentLink1Description=LCSC, ComponentLink1URL=https://www.lcsc.com/product-detail/Light-Emitting-Diodes-LED_Foshan-NationStar-Optoelectronics-NCD0603R3_C3151730.html, Item Type=LED, Manufacturer Part Number=NCD0603R3
LED5: library part NCD0603G2, "Emerald 0603 Light Emitting Diodes (LED) ROHS", LCSC Part Number=C87326, Manufacturer="Foshan NationStar Optoelectronics", Package=0603, ComponentLink1Description=LCSC, ComponentLink1URL=https://www.lcsc.com/product-detail/Light-Emitting-Diodes-LED_Foshan-NationStar-Optoelectronics-NCD0603G2_C87326.html, Item Type=LED, Manufacturer Part Number=NCD0603G2
Q1 Q5: "25V 225mW 800mA NPN SOT-23 Bipolar Transistors - BJT ROHS", LCSC Part Number=C49581, Manufacturer=LRC, Package=SOT-23, ComponentLink1Description=LCSC, ComponentLink1URL=https://www.lcsc.com/product-detail/Bipolar-Transistors-BJT_LRC-L8050QLT1G_C49581.html, Item Type=Mosfet, Manufacturer Part Number=L8050QLT1G
Q2 Q3 Q4: "20V 2.2A 800mW 110mΩ@4.5V,2.7A 810mV@250uA P Channel SOT-23 MOSFETs ROHS", LCSC Part Number=C213159, Manufacturer=WILLSEMI, Package=SOT-23, ComponentLink1Description=LCSC, ComponentLink1URL=https://www.lcsc.com/product-detail/MOSFETs_WILLSEMI-Will-Semicon-WPM2015-3-TR_C213159.html, Item Type=Mosfet, Manufacturer Part Number=WPM2015-3/TR
R1 R2 R3 R4 R5: library part RC0603FR-074K7L, "RES SMD 4.7K OHM 1% 1/10W 0603", Case Code (Imperial)=0603, Case Code (Metric)=1608, Manufacturer=Yageo, Max Operating Temperature=155°C, Max Power Dissipation=100mW, Min Operating Temperature=-55°C, Resistance=4.7kR, Resistance Tolerance=1%, Resistor Type="Thick Film", Supplier Part Number 1=311-4.70KHRCT-ND, Temperature Coefficient=100ppm/°C, Voltage Rating=50V, Case/Package=0603, Category="Chip SMD Resistors", ComponentLink1Description=https://datasheet.ciiva.com/15189/getdatasheetpartid-422754-15189760.pdf?src-supplier=Verical, ComponentLink1URL=https://datasheet.ciiva.com/15189/getdatasheetpartid-422754-15189760.pdf?src-supplier=Verical, ComponentLink2Description=https://datasheet.ciiva.com/22747/443971-22747528.pdf?src-supplier=Element14, ComponentLink2URL=https://datasheet.ciiva.com/22747/443971-22747528.pdf?src-supplier=Element14, ComponentLink3Description=https://datasheet.ciiva.com/7660/38590-7660794.pdf?src-supplier=Element14, ComponentLink3URL=https://datasheet.ciiva.com/7660/38590-7660794.pdf?src-supplier=Element14, ComponentLink4Description=https://datasheet.ciiva.com/7746/1868787-7746365.pdf?src-supplier=Element14, ComponentLink4URL=https://datasheet.ciiva.com/7746/1868787-7746365.pdf?src-supplier=Element14, ComponentLink5Description=https://datasheet.ciiva.com/46440/1868787-46440909.pdf?src-supplier=Element14, ComponentLink5URL=https://datasheet.ciiva.com/46440/1868787-46440909.pdf?src-supplier=Element14, ComponentLink6Description=https://datasheet.ciiva.com/7746/1738695-7746366.pdf?src-supplier=Element14, ComponentLink6URL=https://datasheet.ciiva.com/7746/1738695-7746366.pdf?src-supplier=Element14, Construction=Rectangular, Depth=0.8mm, Features="Moisture Resistant", Height=0.45mm, Lead Free="Lead Free", Lead Pitch=0.3mm, Length=1.6mm, Manufacturer Part Number=RC0603FR-074K7L, Military Standard=Not, Number of Pins=2, Number of Terminations=2, Packaging="Tape and Reel", Power Rating=100mW, Pricing 1="1=0.10000, 10=0.02400, 100=0.00970, 1000=0.00436, 2500=0.00378 (USD)", REACH SVHC="No SVHC", RoHS=Yes, RoHS Compliant=Yes, Series=RC, Size Code=0603, Stock 1=1924316, Supplier 1=Digi-Key, Termination=SMD/SMT, Tolerance=1%, Voltage Rating (DC)=50V, Width=0.8mm
R6 R12: library part RC0402FR-071KL, "RES 1K OHM 1% 1/16W 0402", Case Code (Imperial)=0402, Case Code (Metric)=1005, LCSC Part Number=C106235, Manufacturer=Yageo, Max Operating Temperature=155°C, Max Power Dissipation=63mW, Min Operating Temperature=-55°C, Power Rating=62.5mW, Resistance=1kR, Resistance Tolerance=1%, Resistor Type="Thick Film", Temperature Coefficient=100ppm/°C, Voltage Rating=50V, Case/Package=0402, Category="Chip SMD Resistors", ComponentLink1Description=https://datasheet.ciiva.com/11819/0900766b80c66297-11819477.pdf?src-supplier=RSComponents, ComponentLink1URL=https://datasheet.ciiva.com/11819/0900766b80c66297-11819477.pdf?src-supplier=RSComponents, ComponentLink2Description=https://datasheet.ciiva.com/7983/1018594-7983502.pdf?src-supplier=Element14, ComponentLink2URL=https://datasheet.ciiva.com/7983/1018594-7983502.pdf?src-supplier=Element14, ComponentLink3Description=https://datasheet.ciiva.com/22747/1018594-22747513.pdf?src-supplier=Element14, ComponentLink3URL=https://datasheet.ciiva.com/22747/1018594-22747513.pdf?src-supplier=Element14, ComponentLink4Description=https://datasheet.ciiva.com/12666/pyu-rc0402-51-rohs-l-6-r-12666741.pdf?src-supplier=Mouser, ComponentLink4URL=https://datasheet.ciiva.com/12666/pyu-rc0402-51-rohs-l-6-r-12666741.pdf?src-supplier=Mouser, ComponentLink5Description=https://datasheet.ciiva.com/7849/1018594-7849869.pdf?src-supplier=Element14, ComponentLink5URL=https://datasheet.ciiva.com/7849/1018594-7849869.pdf?src-supplier=Element14, ComponentLink6Description=https://datasheet.ciiva.com/7849/1018594-7849871.pdf?src-supplier=Element14, ComponentLink6URL=https://datasheet.ciiva.com/7849/1018594-7849871.pdf?src-supplier=Element14, ComponentLink7Description=https://datasheet.ciiva.com/17063/pyu-rc0402-51-rohs-l-6-r-17063193.pdf?src-supplier=Future+Electronics, ComponentLink7URL=https://datasheet.ciiva.com/17063/pyu-rc0402-51-rohs-l-6-r-17063193.pdf?src-supplier=Future+Electronics, Construction=Rectangular, Depth=0.5mm, Features="Moisture Resistant", Height=0.32mm, Item Type=Resistor, Lead Free="Lead Free", Length=1mm, Manufacturer Part Number=RC0402FR-071KL, Military Standard=Not, Number of Pins=2, Number of Terminations=2, Packaging="Tape and Reel", Pricing 1="10000=0.00085, 20000=0.00087, 40000=0.00084, 60000=0.00083, 80000=0.00079, 100000=0.00078, 1000000=0.00076 (USD)", Reach SVHC Compliant=Yes, RoHS=Yes, RoHS Compliant=Yes, Series=RC, Size Code=0402, Stock 1=13030000, Supplier 1=Avnet, Supplier Part Number 1=RC0402FR-071KL, Technology="THICK FILM", Termination=SMD/SMT, Tolerance=1%, Voltage Rating (DC)=50V, Width=0.5mm